# Altium PCB PCB_tm1637_.pcbdoc
Units mm, origin at the board's own origin, x right, y up, seen from the top; angles counter-clockwise.
Board outline 85.4 x 85.4 mm, 2 copper layers (Top Layer, Bottom Layer); 39 components, 20 nets, 102 pads, 12 vias.
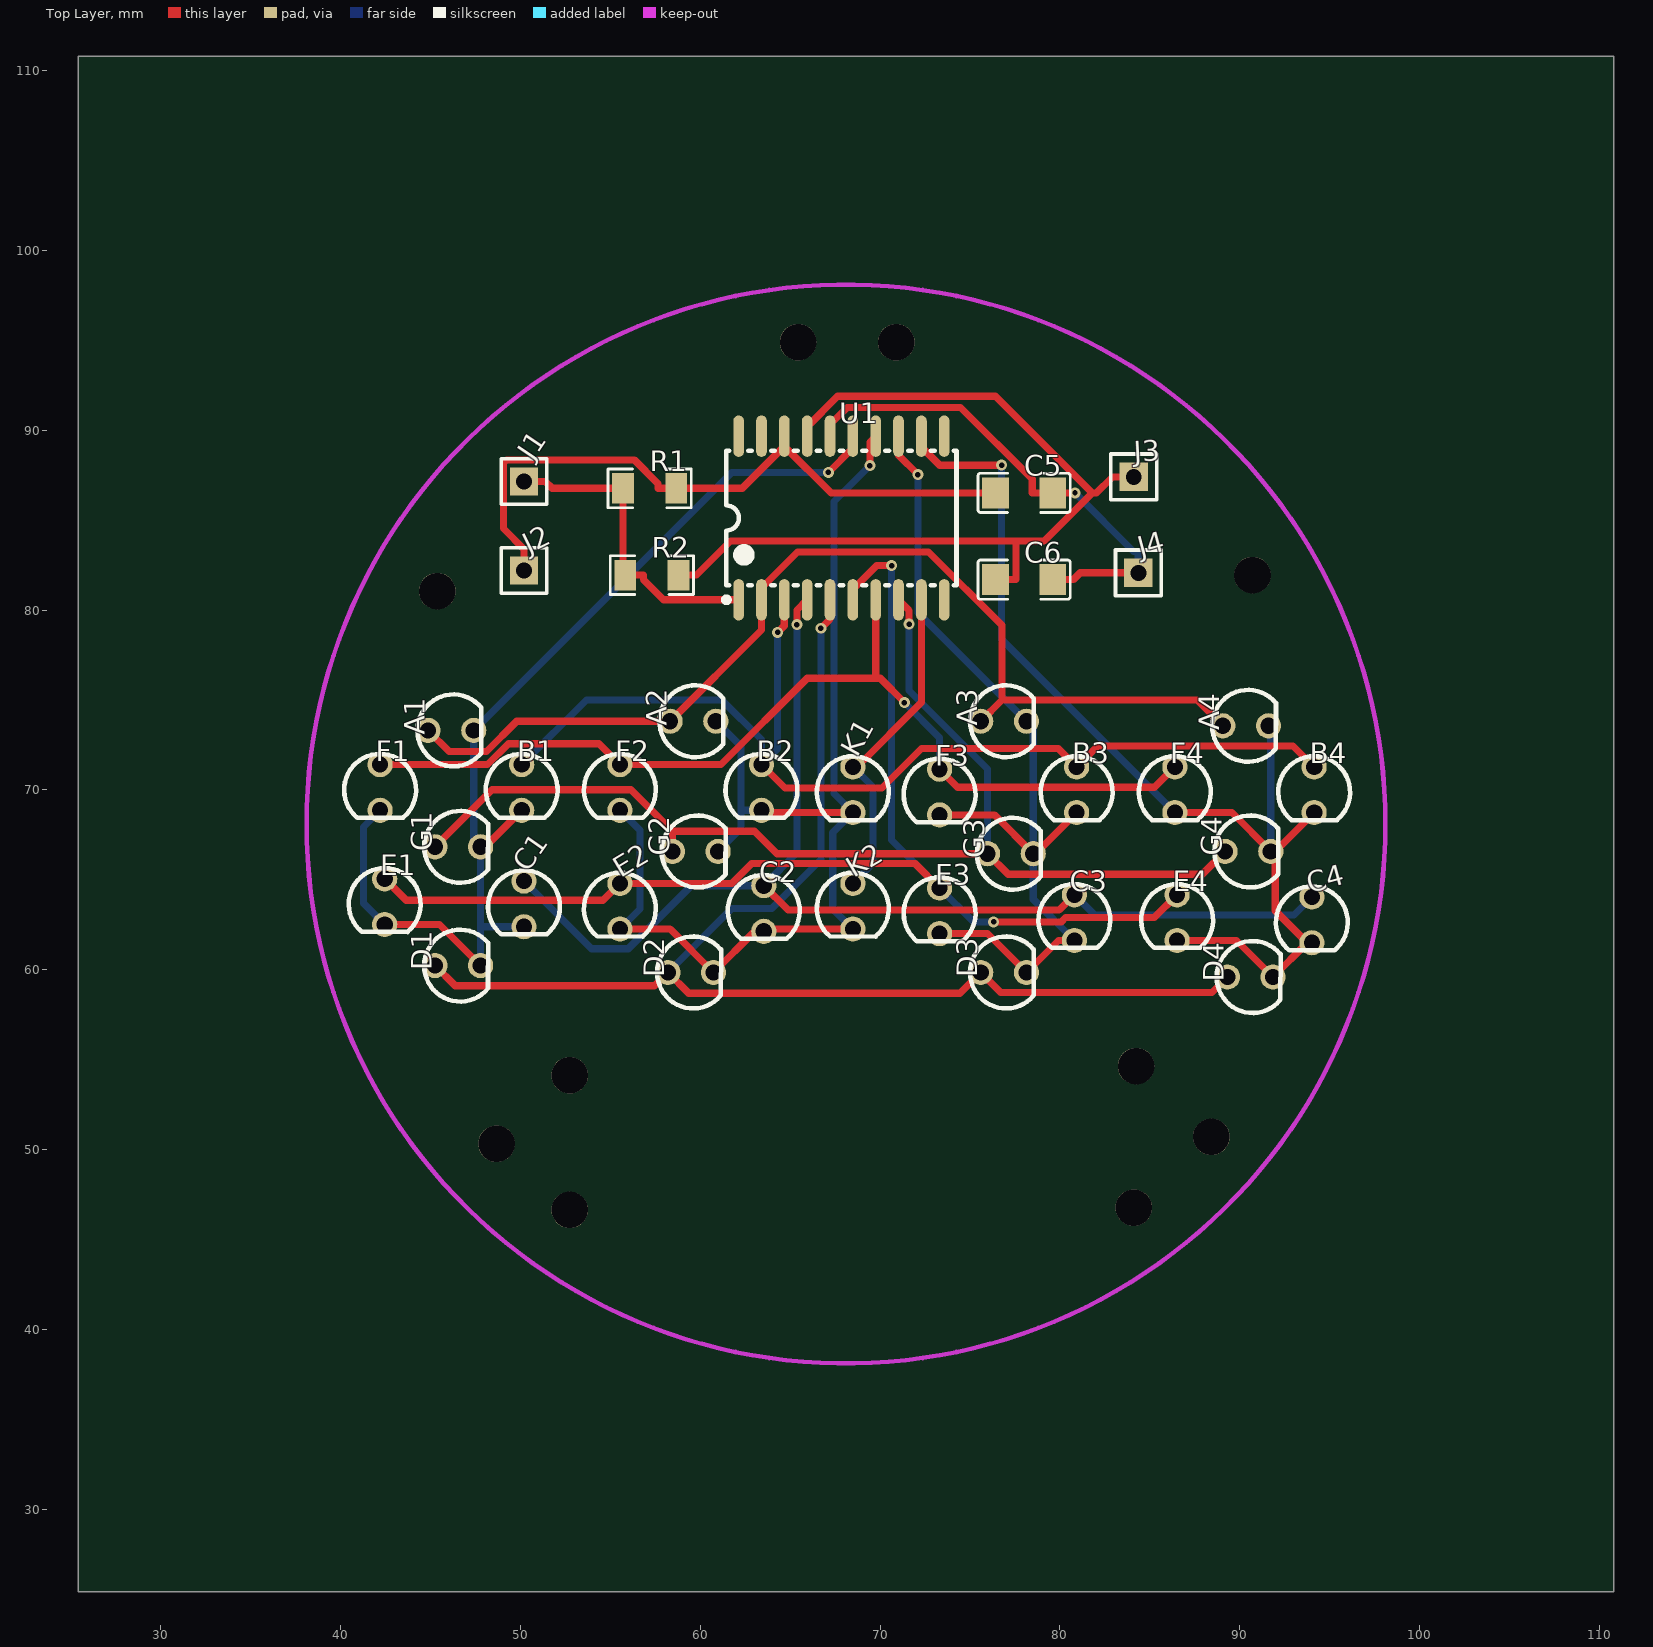
[diagram p0: Top Layer view]
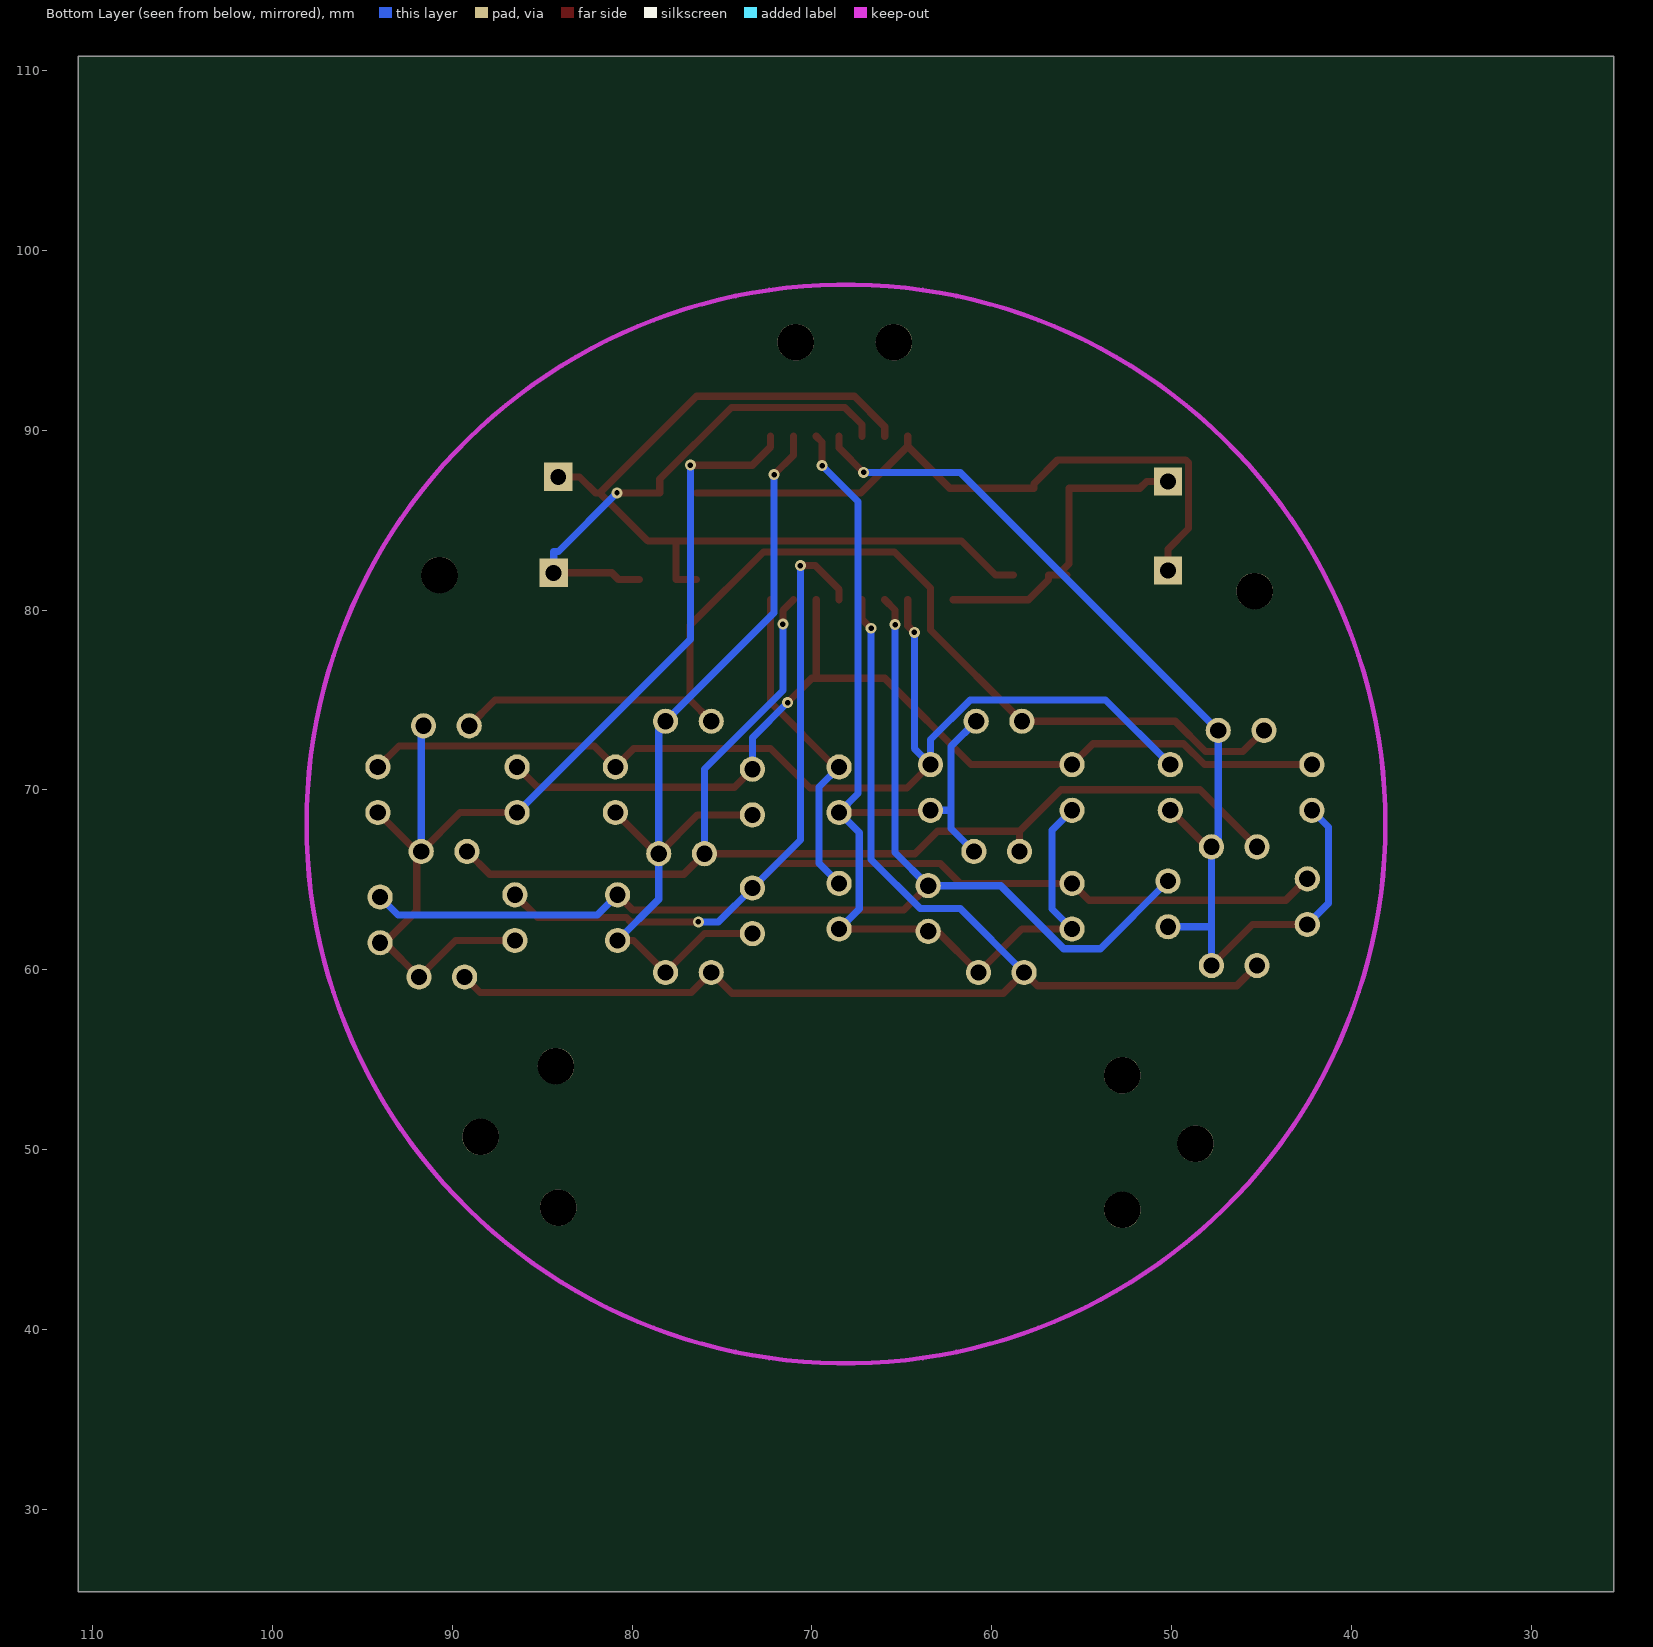
[diagram p1: Bottom Layer view, seen from below]

## Layer stack, top to bottom
Top Layer: signal copper (thickness not stored)
Dielectric: dielectric 0.32, FR-4, Dk 4.8
Bottom Layer: signal copper (thickness not stored)

## Board outline
110.8,25.4 25.4,25.4 25.4,110.8 110.8,110.8

## Components (designator, comment, footprint, x,y, rotation, side; value= is the part's Value field where it differs from the comment)
A1 "LED-TH-3mm_R" LED-TH_BD3.0_RED 46.129,73.307 r90 top
A2 "LED-TH-3mm_R" LED-TH_BD3.0_RED 59.591,73.815 r90 top
A3 "LED-TH-3mm_R" LED-TH_BD3.0_RED 76.863,73.815 r90 top
A4 "LED-TH-3mm_R" LED-TH_BD3.0_RED 90.325,73.561 r90 top
B1 "LED-TH-3mm_R" LED-TH_BD3.0_RED 50.066,70.132 r0 top
B2 "LED-TH-3mm_R" LED-TH_BD3.0_RED 63.401,70.132 r0 top
B3 "LED-TH-3mm_R" LED-TH_BD3.0_RED 80.927,70.005 r0 top
B4 "LED-TH-3mm_R" LED-TH_BD3.0_RED 94.135,70.005 r0 top
C1 "LED-TH-3mm_R" LED-TH_BD3.0_RED 50.193,63.655 r0 top
C2 "LED-TH-3mm_R" LED-TH_BD3.0_RED 63.528,63.401 r0 top
C3 "LED-TH-3mm_R" LED-TH_BD3.0_RED 80.8,62.893 r0 top
C4 "LED-TH-3mm_R" LED-TH_BD3.0_RED 94.008,62.766 r0 top
C5 "0.1u" C1206 78.006,86.515 r0 top
C6 "0.1u" C1206 78.006,81.689 r0 top
D1 "LED-TH-3mm_R" LED-TH_BD3.0_RED 46.51,60.226 r90 top
D2 "LED-TH-3mm_R" LED-TH_BD3.0_RED 59.464,59.845 r90 top
D3 "LED-TH-3mm_R" LED-TH_BD3.0_RED 76.863,59.845 r90 top
D4 "LED-TH-3mm_R" LED-TH_BD3.0_RED 90.579,59.591 r90 top
E1 "LED-TH-3mm_R" LED-TH_BD3.0_RED 42.446,63.782 r0 top
E2 "LED-TH-3mm_R" LED-TH_BD3.0_RED 55.527,63.528 r0 top
E3 "LED-TH-3mm_R" LED-TH_BD3.0_RED 73.307,63.274 r0 top
E4 "LED-TH-3mm_R" LED-TH_BD3.0_RED 86.515,62.893 r0 top
F1 "LED-TH-3mm_R" LED-TH_BD3.0_RED 42.192,70.132 r0 top
F2 "LED-TH-3mm_R" LED-TH_BD3.0_RED 55.527,70.132 r0 top
F3 "LED-TH-3mm_R" LED-TH_BD3.0_RED 73.307,69.878 r0 top
F4 "LED-TH-3mm_R" LED-TH_BD3.0_RED 86.388,70.005 r0 top
G1 "LED-TH-3mm_R" LED-TH_BD3.0_RED 46.51,66.83 r90 top
G2 "LED-TH-3mm_R" LED-TH_BD3.0_RED 59.718,66.576 r90 top
G3 "LED-TH-3mm_R" LED-TH_BD3.0_RED 77.244,66.449 r90 top
G4 "LED-TH-3mm_R" LED-TH_BD3.0_RED 90.452,66.576 r90 top
J1 "HDR-M-2.54_1x1" HDR-M-2.54_1X1 50.193,87.15 r0 top
J2 "HDR-M-2.54_1x1" HDR-M-2.54_1X1 50.193,82.197 r0 top
J3 "HDR-M-2.54_1x1" HDR-M-2.54_1X1 84.102,87.404 r0 top
J4 "HDR-M-2.54_1x1" HDR-M-2.54_1X1 84.356,82.07 r0 top
K1 "LED-TH-3mm_R" LED-TH_BD3.0_RED 68.481,70.005 r0 top
K2 "LED-TH-3mm_R" LED-TH_BD3.0_RED 68.481,63.528 r0 top
R1 "10k" R1206 57.178,86.769 r0 top
R2 "10k" R1206 57.305,81.943 r0 top
U1 "TM1637" SOP-20_L12.8-W7.5-P1.27-LS10.4-BL 67.846,85.118 r0 top

## Footprints (in the part's own frame and the unit in brackets; to place one, negate y for a bottom-side part, rotate by r counter-clockwise, add the part's x,y. Pads: shape width x height; smd on the part's side, far side on the other; paste and mask are expansions set on the pad)
C1206 [mm]
  rect 1.485x1.728 smd paste-100 mask+0.051: 1(-1.593,0) 2(1.593,0)
  silkscreen extent -2.56,-1.09 2.56,1.09
HDR-M-2.54_1X1 [mil]
  rect 62x62 hole 35 paste+0 mask+2: 1(0,0)
  silkscreen extent -50,-50 50,50
LED-TH_BD3.0_RED [mm]
  round 1.4 hole 0.9 paste+0 mask+0.051: 1(0,1.27) 2(0,-1.27)
  silkscreen extent -2,-1.69 2,1.87
R1206 [mm]
  rect 1.208x1.701 smd paste-100 mask+0.051: 1(-1.479,0) 2(1.479,0)
  silkscreen extent -2.31,-1.08 2.31,1.08
SOP-20_L12.8-W7.5-P1.27-LS10.4-BL [mm]
  oval 0.6x2.3 smd paste+0 mask+0.051: 1(-5.715,-4.55) 2(-4.445,-4.55) 3(-3.175,-4.55) 4(-1.905,-4.55) 5(-0.635,-4.55) 6(0.635,-4.55) 7(1.905,-4.55) 8(3.175,-4.55) 9(4.445,-4.55) 10(5.715,-4.55) 11(5.715,4.55) 12(4.445,4.55) 13(3.175,4.55) 14(1.905,4.55) 15(0.635,4.55) 16(-0.635,4.55) 17(-1.905,4.55) 18(-3.175,4.55) 19(-4.445,4.55) 20(-5.715,4.55)
  silkscreen extent -6.55,-4.7 6.4,3.75

## Free pads (board coordinates)
  round 2.032 hole 2.032 unplated paste+0: ""(45.367,81.054) ""(48.669,50.32) ""(52.733,46.637) ""(52.733,54.13) ""(65.433,94.897) ""(70.894,94.897) ""(84.102,46.764) ""(84.229,54.638) ""(88.42,50.701) ""(90.706,81.943)

## Via types
v1: diameter 0.61, hole 0.305, Top Layer to Bottom Layer, tented both sides, 12 vias

## Nets (pads, with @x,y where several pads share a name; then routed paths per layer and width w, separated by ;. In a path a pad name is that pad's centre, name@x,y a point inside that pad or via, vN(x,y) a via of type N, cw(c..) or ccw(c..) an arc to the next point about the centre after c; other vN are vias at no path point)
A1_1: A1.1 A2.1 A3.1 A4.1 U1.2 | length 58.8
  Top Layer w0.4: A1.1 46.041,72.125 48.1,72.125 49.791,73.815 A2.1 63.401,78.895 U1.2 63.401,81.229 65.401,83.23 72.692,83.23 76.769,79.153 76.769,74.991 ; A3.1 76.769,74.991 ; A4.1 87.625,74.991 76.769,74.991
A1_2: A1.2 B1.2 C1.2 D1.2 E1.2 F1.2 G1.2 U1.15 | length 60.5
  Top Layer w0.4: E1.2 45.494,62.512 D1.2 ; G1.2 48.034,66.83 B1.2 ; v1(67.121,87.649) 68.481,89.009 U1.15
  Bottom Layer w0.4: F1.2 41.268,67.938 41.268,63.69 E1.2 ; D1.2 47.78,62.385 ; C1.2 47.78,62.385 ; v1(67.121,87.649) 61.741,87.649 A1.2 47.399,67.211 G1.2 47.78,62.385
B1_1: B1.1 B2.1 B3.1 B4.1 U1.3 | length 60.4
  Top Layer w0.4: B2.1 64.701,70.101 70.1,70.101 72.3,72.301 79.901,72.301 B3.1 82.096,72.444 92.965,72.444 B4.1 ; v1(64.298,78.756) 64.671,79.128 U1.3
  Bottom Layer w0.4: B1.1 53.666,75.002 61.191,75.002 63.401,72.792 B2.1 64.298,72.299 v1(64.298,78.756)
C1_1: C1.1 C2.1 C3.1 C4.1 U1.4 | length 65.5
  Top Layer w0.4: C2.1 64.882,63.317 79.954,63.317 C3.1 ; v1(65.371,79.191) 65.371,79.999 U1.4
  Bottom Layer w0.4: C1.1 53.954,61.164 55.988,61.164 59.495,64.671 C2.1 65.371,66.514 v1(65.371,79.191) ; C3.1 81.927,63.036 93.008,63.036 C4.1
D1_1: D1.1 D2.1 D3.1 D4.1 U1.5 | length 72.4
  Top Layer w0.4: D1.1 46.366,59.1 57.449,59.1 D2.1 59.35,58.689 74.436,58.689 D3.1 76.707,58.731 88.449,58.731 D4.1 ; v1(66.705,78.986) 67.211,79.492 U1.5
  Bottom Layer w0.4: D2.1 61.75,63.401 63.975,63.401 66.705,66.13 v1(66.705,78.986)
E1_1: E1.1 E2.1 E3.1 E4.1 U1.6 | length 69.7
  Top Layer w0.4: E1.1 43.643,63.855 54.584,63.855 E2.1 61.75,64.798 62.847,65.895 71.956,65.895 E3.1 ; U1.6 68.481,81.139 69.815,82.473 v1(70.634,82.473) ; v1(76.307,62.658) 80.078,62.658 80.313,62.893 85.245,62.893 E4.1
  Bottom Layer w0.4: v1(70.634,82.473) 70.634,67.217 E3.1 75.193,62.658 v1(76.307,62.658)
F1_1: F1.1 F2.1 F3.1 F4.1 U1.7 | length 55.5
  Top Layer w0.4: F1.1 48.161,71.402 49.324,72.565 54.364,72.565 F2.1 61.142,71.402 65.941,76.201 69.751,76.201 ; U1.7 69.751,76.201 ; v1(71.35,74.852) 70.001,76.201 69.751,76.201 ; F3.1 74.307,70.148 85.261,70.148 F4.1
  Bottom Layer w0.4: v1(71.35,74.852) 73.307,72.894 F3.1
G1_1: G1.1 G2.1 G3.1 G4.1 U1.8 | length 65
  Top Layer w0.4: G1.1 48.413,70.003 56.143,70.003 58.448,67.699 ; G2.1 58.448,67.699 ; U1.8 71.608,79.981 v1(71.608,79.219) ; G4.1 87.91,65.304 77.119,65.304 G3.1 64.268,66.449 63.018,67.699 58.448,67.699
  Bottom Layer w0.4: v1(71.608,79.219) 71.608,75.525 75.974,71.159 G3.1
G2_2: A2.2 B2.2 C2.2 D2.2 E2.2 F2.2 G2.2 K1.2 K2.2 U1.14 | length 66.8
  Top Layer w0.4: E2.2 58.321,62.258 D2.2 63.02,62.131 C2.2 63.655,62.258 K2.2 ; B2.2 63.528,68.735 K1.2 ; v1(69.432,88.033) 69.432,89.349 U1.14
  Bottom Layer w0.4: E2.2 56.641,63.373 56.641,67.747 F2.2 ; A2.2 62.258,72.418 62.258,68.862 ; G2.2 62.258,67.846 62.258,68.862 ; B2.2 62.258,68.862 ; K2.2 67.366,63.373 67.366,67.62 K1.2 67.427,69.789 67.427,86.029 v1(69.432,88.033)
G3_2: A3.2 B3.2 C3.2 D3.2 E3.2 F3.2 G3.2 U1.13 | length 50.7
  Top Layer w0.4: U1.13 71.021,88.609 v1(72.097,87.533) ; E3.2 75.974,62.004 D3.2 79.911,61.623 C3.2 ; F3.2 76.355,68.608 G3.2 78.641,66.449 B3.2
  Bottom Layer w0.4: v1(72.097,87.533) 72.097,79.851 A3.2 78.514,73.434 G3.2 78.514,63.909 C3.2
G4_2: A4.2 B4.2 C4.2 D4.2 E4.2 F4.2 G4.2 U1.12 | length 60.3
  Top Layer w0.4: U1.12 72.291,89.079 73.318,88.052 v1(76.751,88.052) ; F4.2 89.563,68.735 G4.2 G4.2@91.976,66.576 ; E4.2 89.817,61.623 D4.2 C4.2@93.754,61.496 ; C4.2 C4.2@93.754,61.496 ; B4.2 G4.2@91.976,66.576 ; G4.2@91.976,66.576 91.976,63.274 C4.2@93.754,61.496
  Bottom Layer w0.4: v1(76.751,88.052) 76.751,78.372 F4.2 ; A4.2 91.722,73.434 G4.2
K1_1: K1.1 K2.1 U1.9 | length 18.4
  Top Layer w0.4: K1.1 68.704,71.275 72.291,74.861 U1.9
  Bottom Layer w0.4: K2.1 69.595,65.913 69.595,70.16 K1.1
U1_1: J1.1 R1.1 R2.1 U1.1 | length 17.8
  Top Layer w0.4: J1.1 51.381,87.15 51.762,86.769 R1.1 55.699,82.572 R2.1@56.328,81.943 ; R2.1 R2.1@56.328,81.943 ; U1.1 57.954,80.568 56.83,81.692 56.83,81.943 R2.1@56.328,81.943
U1_10: U1.10
U1_11: U1.11
U1_16: C5.2 C6.2 J4.1 U1.16 | length 28.1
  Top Layer w0.4: U1.16 67.211,90.316 68.164,91.269 74.467,91.269 78.455,87.28 78.455,86.515 C5.2 80.741,86.515 v1(80.835,86.515) ; C6.2 80.741,81.689 81.122,82.07 J4.1
  Bottom Layer w0.4: v1(80.835,86.515) 84.092,83.258 84.356,83.258 J4.1
U1_17: C6.1 J3.1 R2.2 U1.17 | length 50.2
  Top Layer w0.4: R2.2 59.788,81.943 61.677,83.832 77.557,83.832 ; U1.17 65.941,90.194 67.634,91.888 76.421,91.888 81.798,86.511 ; C6.1 76.985,81.689 77.557,81.689 77.557,83.832 ; J3.1 83.508,87.404 82.914,87.404 82.021,86.511 81.798,86.511 ; 77.557,83.832 79.119,83.832 81.798,86.511
U1_18: C5.1 J2.1 R1.2 U1.18 | length 37.3
  Top Layer w0.4: J2.1 50.193,83.385 49.052,84.526 49.052,88.187 49.215,88.35 56.322,88.35 57.652,87.02 57.652,86.769 R1.2 62.33,86.769 U1.18@64.671,89.11 ; U1.18 U1.18@64.671,89.11 ; C5.1 67.266,86.515 U1.18@64.671,89.11
U1_19: U1.19
U1_20: U1.20

## Keep-outs
Keep-Out Layer:
  circle w0.254: c68.1,68.1 r30

## Silkscreen, mask and mechanical layers (free items; w line width, h text height)
Top Solder:
  lines w0.356: 71.021,89.668 71.021,89.228 78.133,82.116 78.133,73.815